# Altium PCB AVault.PcbDoc (part 1 of 2)
Units mm, origin at the board's own origin, x right, y up, seen from the top; angles counter-clockwise.
Board outline 85.78 x 73.28 mm, 2 copper layers (Top Layer, Bottom Layer); 122 components, 80 nets, 439 pads, 261 vias.
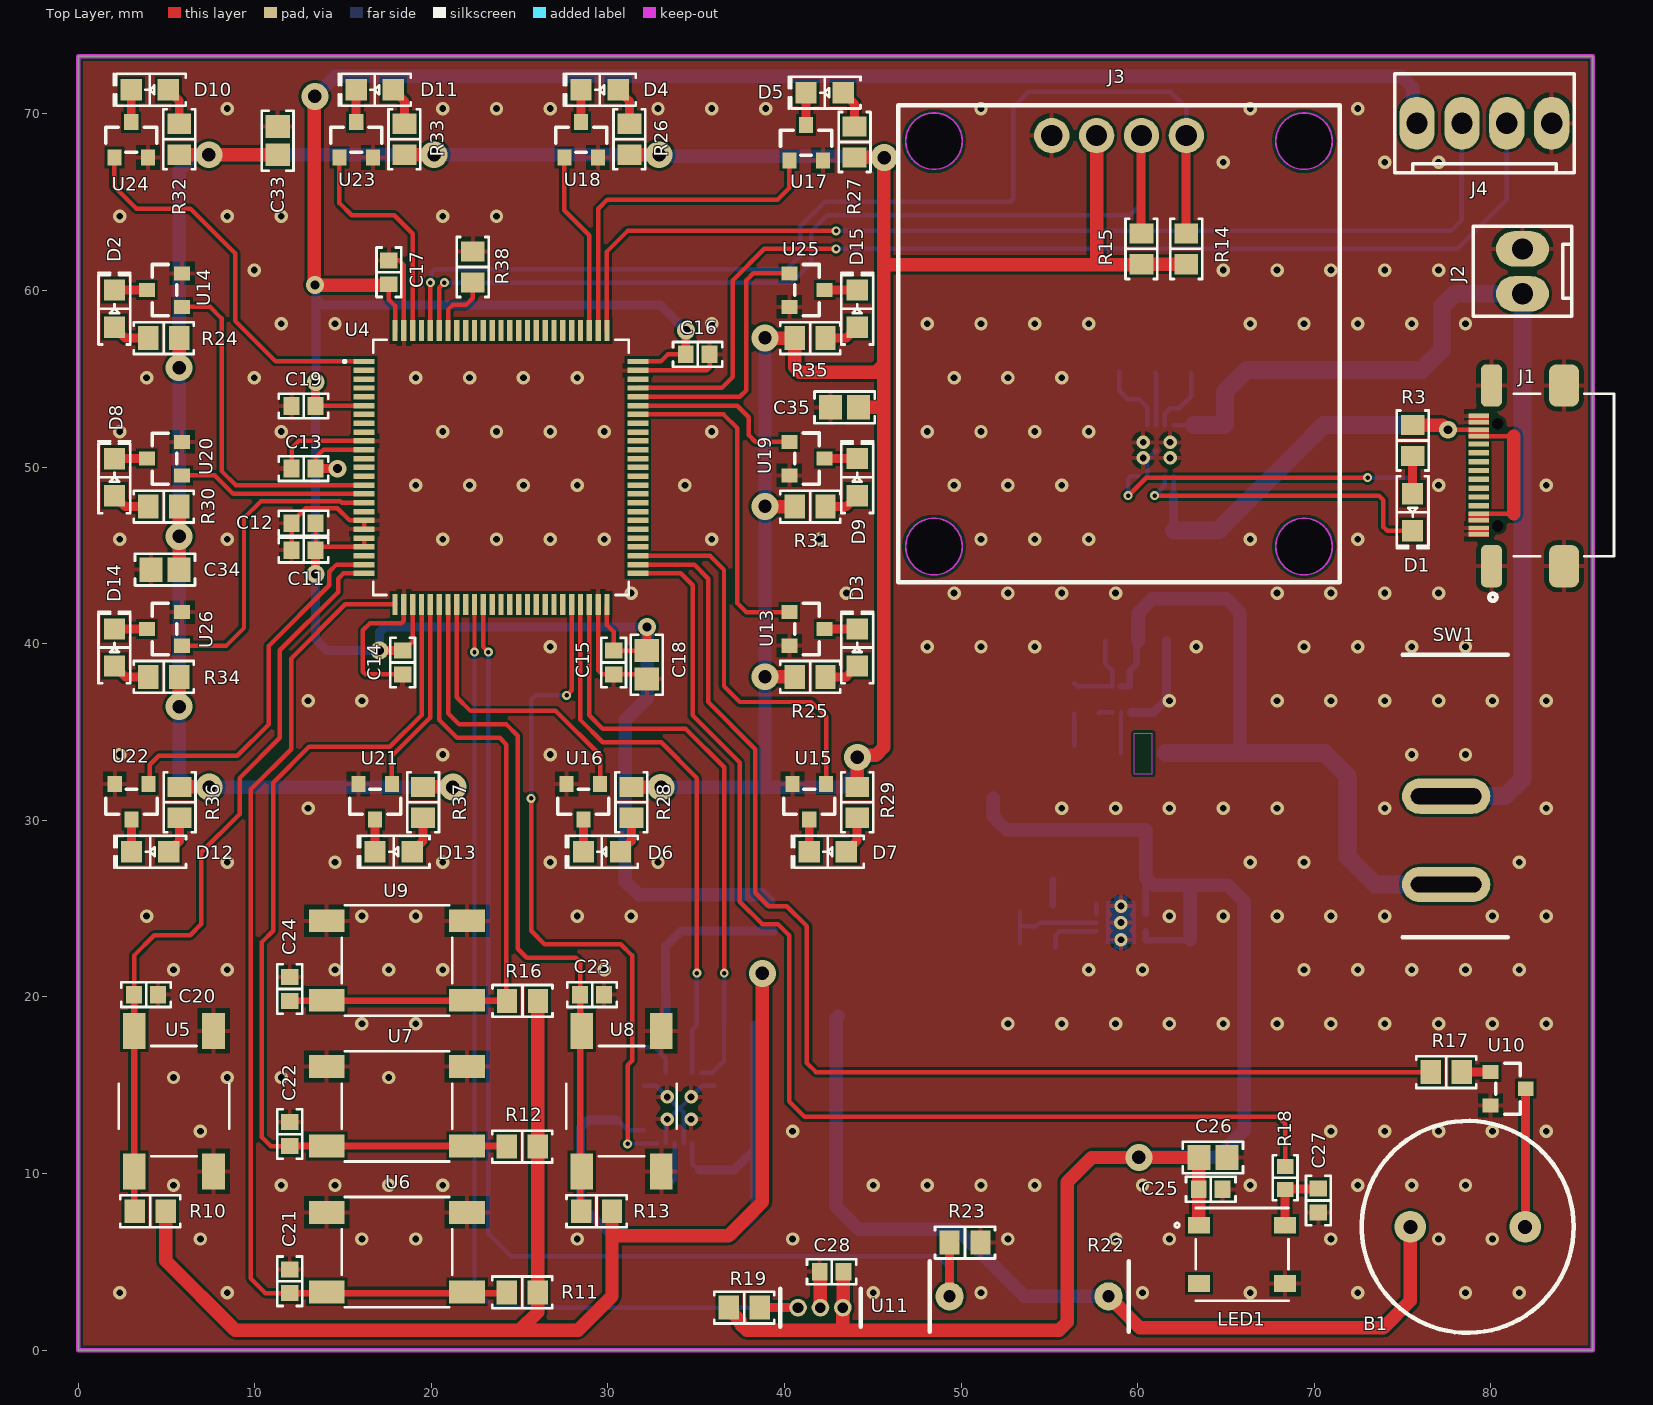
[diagram p0: Top Layer view]
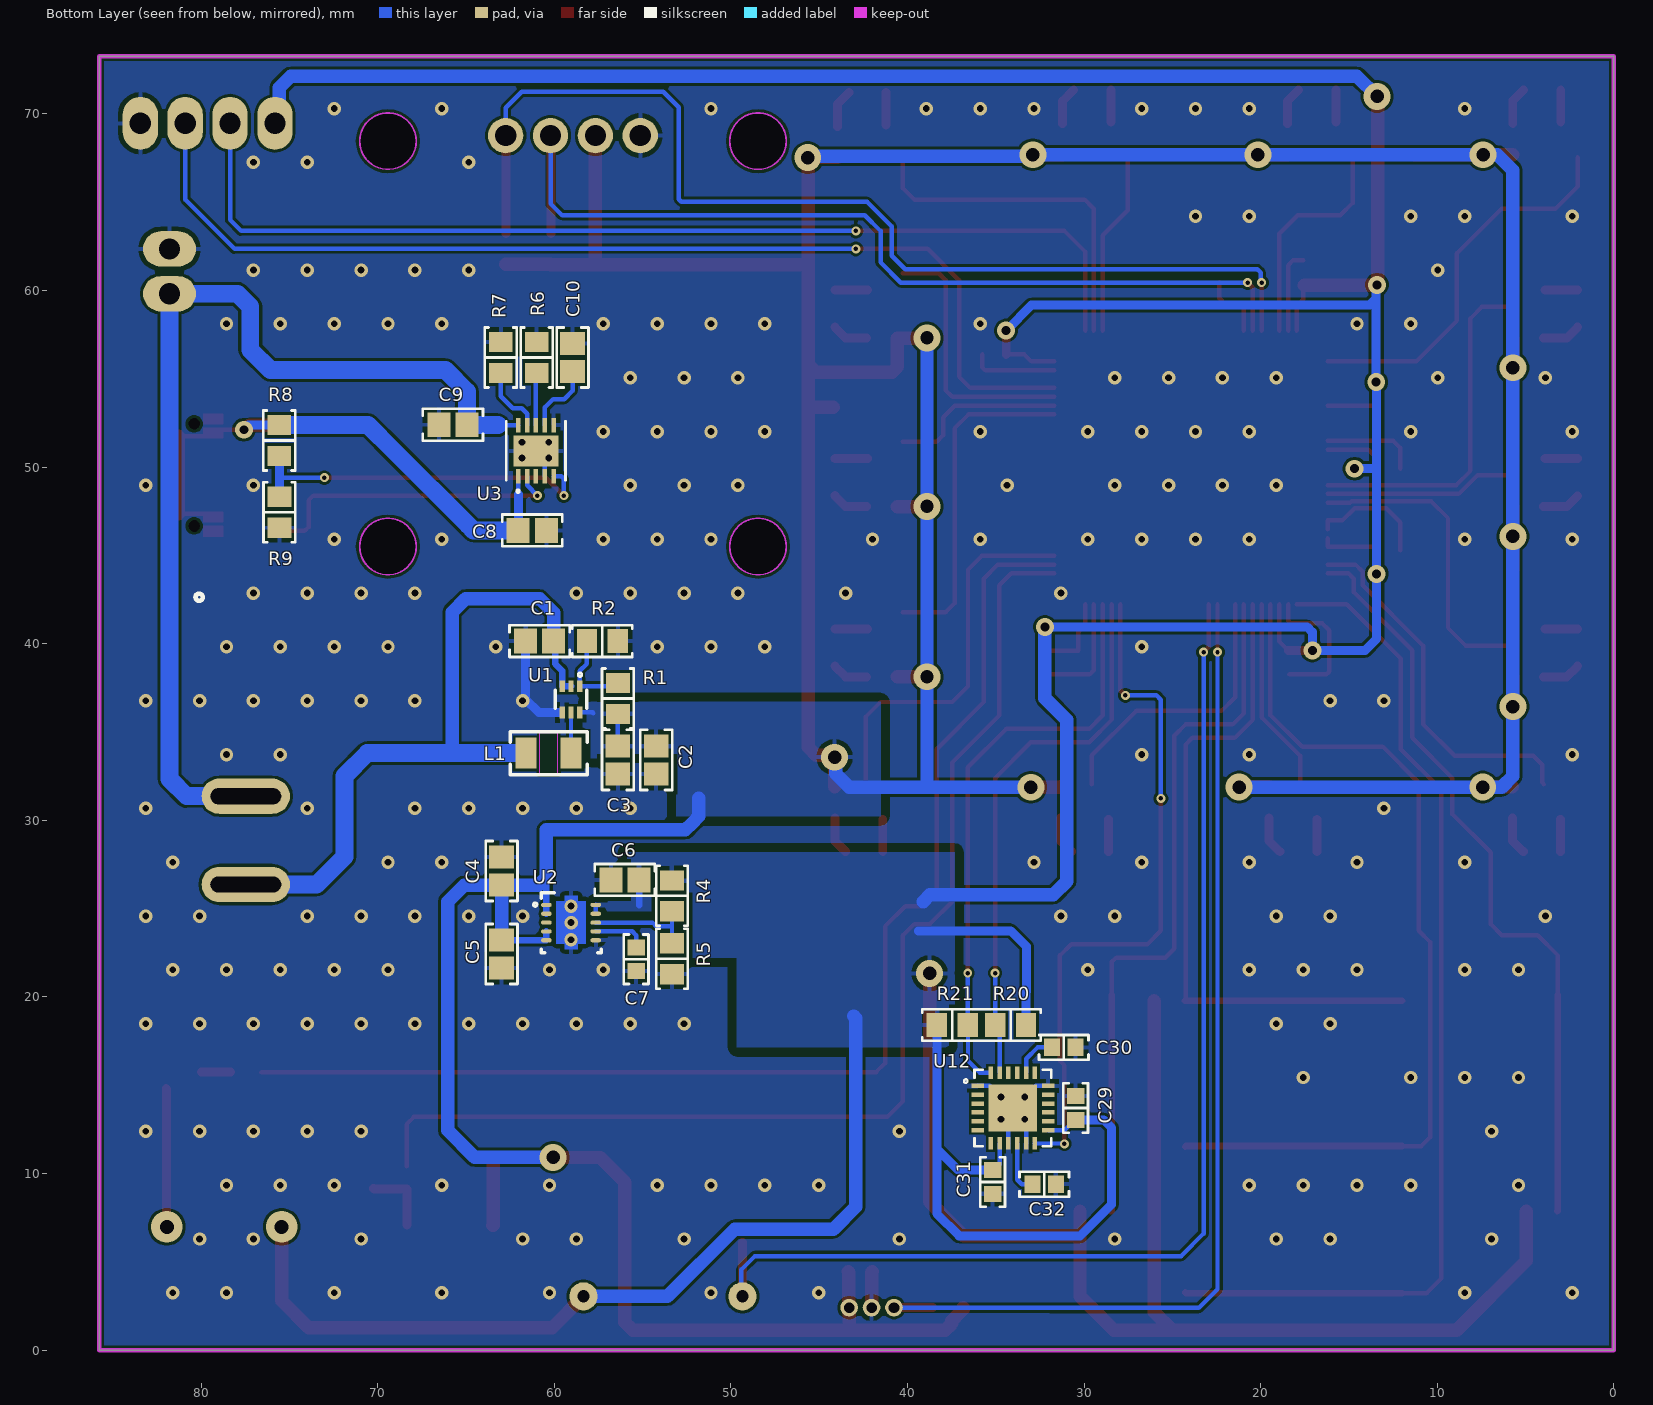
[diagram p1: Bottom Layer view, seen from below]
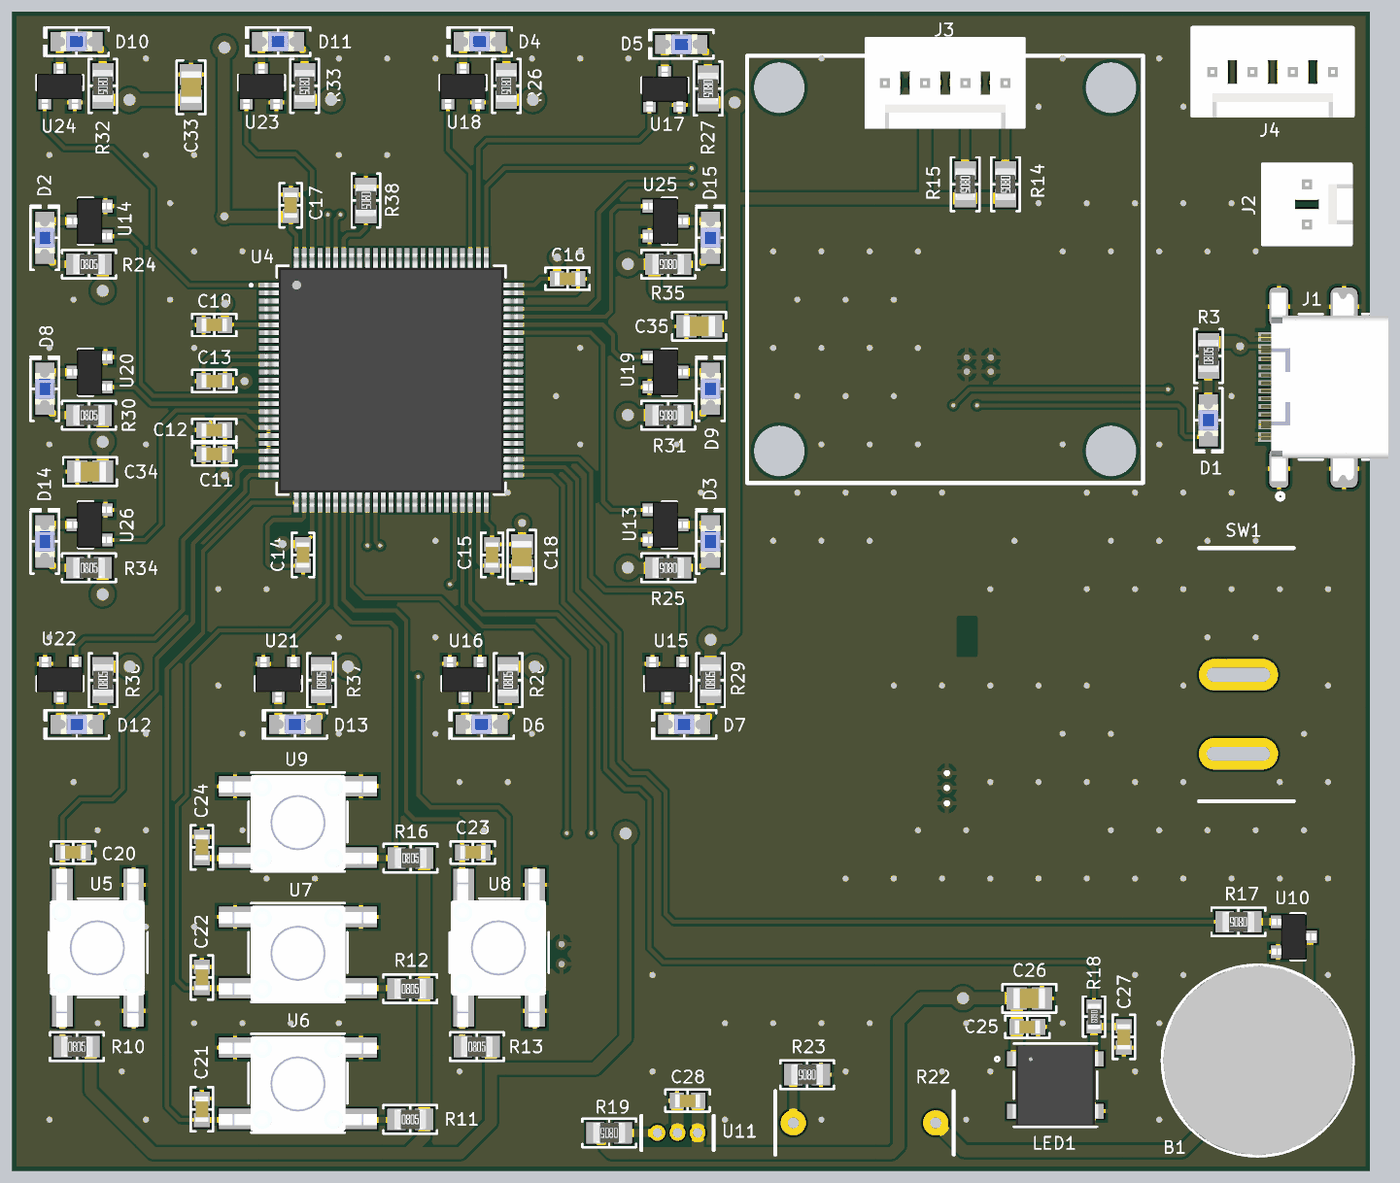
[diagram p3: 3D render of the assembled board from above, using the file's embedded part models]
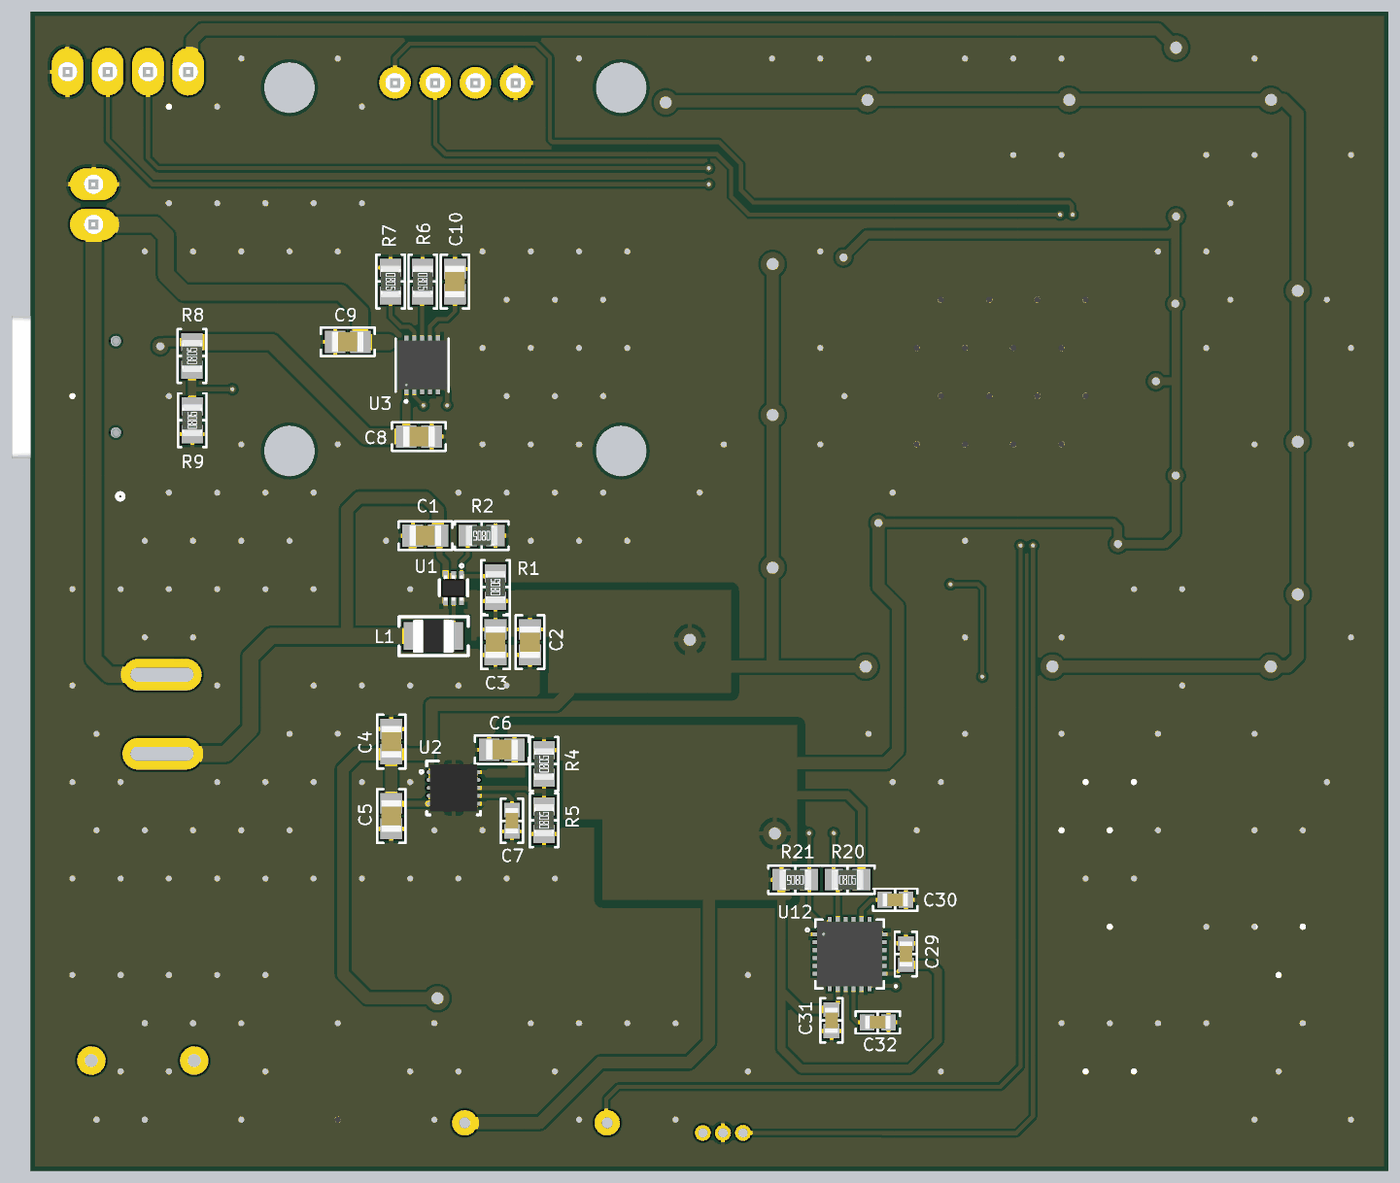
[diagram p4: 3D render of the assembled board from below, using the file's embedded part models]

## Layer stack, top to bottom
Top Solder: solder mask 0.0102, Solder Resist, Dk 3.5
Top Layer: signal copper 0.0356
Dielectric 1: dielectric 0.32, FR-4, Dk 4.8
Bottom Layer: signal copper 0.0356
Bottom Solder: solder mask 0.0102, Solder Resist, Dk 3.5

## Board outline
0,0 0,73.279 85.776,73.279 85.776,0
cut-out: 67.82,68.46 ccw(c69.42,68.46) 69.42,66.86 ccw(c69.42,68.46) 71.02,68.46 ccw(c69.42,68.46) 69.42,70.06 ccw(c69.42,68.46)
cut-out: 67.82,45.506 ccw(c69.42,45.506) 69.42,43.906 ccw(c69.42,45.506) 71.02,45.506 ccw(c69.42,45.506) 69.42,47.106 ccw(c69.42,45.506)
cut-out: 48.466,66.86 cw(c48.466,68.46) 46.866,68.46 cw(c48.466,68.46) 48.466,70.06 cw(c48.466,68.46) 50.066,68.46 cw(c48.466,68.46)
cut-out: 46.866,45.506 ccw(c48.466,45.506) 48.466,43.906 ccw(c48.466,45.506) 50.066,45.506 ccw(c48.466,45.506) 48.466,47.106 ccw(c48.466,45.506)

## Design rules (kind name [scope] priority, off if disabled: settings)
Clearance Clearance_1 [(InNet('+3V3') or InNet('+5V')) and InPolygon] p1: gap=0.508 ignorepadtopadclearanceinfootprint=FALSE
Clearance [All] p2: gap=0.152 ignorepadtopadclearanceinfootprint=FALSE
HoleSize [All] p1: absolutevalues=TRUE maxlimit=5 minlimit=0.025 maxpercent=80.000 minpercent=20.000
MinimumSolderMaskSliver [All] p1: minsoldermaskwidth=0.05
PasteMaskExpansion [All] p1: expansion=0 thpadusetoppaste=TRUE thpadusebottompaste=TRUE
PolygonConnect [All] p1: connectstyle=Relief reliefconductorwidth=0.254 reliefentries=4 polygonreliefangle="90 Angle" airgapwidth=0.254
RoutingVias [All] p1: holewidth=0.254 width=0.508 viastyle="Through Hole" minholewidth=0.203 minwidth=0.406 maxholewidth=0.762 maxwidth=1.524
SilkToSilkClearance [All] p1: silktosilkclearance=0.05
SilkToSolderMaskClearance [IsPad] p1: minsilkscreentomaskgap=0.05 clearancetoexposedcopper=TRUE
SolderMaskExpansion SolderMaskExpansion_Via [IsVia] p1: expansion=0 istentingtop=TRUE
SolderMaskExpansion [All] p2: expansion=0.1 istentingtop=FALSE
SupplyNets "Schematic Supply Nets_5" [InNet('VBUS')] p1: voltage=0.000
SupplyNets "Schematic Supply Nets_4" [InNet('+5V')] p2: voltage=0.000
SupplyNets "Schematic Supply Nets_3" [InNet('VBQ')] p3: voltage=0.000
SupplyNets "Schematic Supply Nets_2" [InNet('VBAT')] p4: voltage=0.000
SupplyNets "Schematic Supply Nets_1" [InNet('GND')] p5: voltage=0.000
SupplyNets "Schematic Supply Nets" [InNet('+3V3')] p6: voltage=0.000
Width [All] p1: maxlimit=1.016 minlimit=0.203 preferedwidth=0.203
25 further rules are at their usual default settings.

## Classes and differential pairs
component class U_Power: C1 C2 C3 C4 C5 C6 C7 C8 C9 C10 D1 J1 J2 L1 R1 R2 R3 R4 R5 R6 R7 R8 R9 SW1 U1 U2 U3
component class U_MCU: C11 C12 C13 C14 C15 C16 C17 C18 C19 J4 R38 U4
component class U_Lighting: C33 C34 C35 D2 D3 D4 D5 D6 D7 D8 D9 D10 D11 D12 D13 D14 D15 R24 R25 R26 R27 R28 R29 R30 R31 R32 R33 R34 R35 R36 R37 U13 U14 U15 U16 U17 U18 U19 U20 U21 U22 U23 U24 U25 U26
component class U_IO_Devices: B1 C20 C21 C22 C23 C24 C25 C26 C27 C28 C29 C30 C31 C32 J3 LED1 R10 R11 R12 R13 R14 R15 R16 R17 R18 R19 R20 R21 R22 R23 U5 U6 U7 U8 U9 U10 U11 U12

## Components (designator, comment, footprint, x,y, rotation, side; value= is the part's Value field where it differs from the comment)
B1 "HSD-1206W03" HSD-1206W03 78.688,6.985 r0 top
C1 "10 µF" "CAP 0805_2012" 60.833,40.154 r180 bottom
C2 "4.7 µF" "CAP 0805_2012" 54.229,33.423 r90 bottom
C3 "4.7 µF" "CAP 0805_2012" 56.402,33.423 r90 bottom
C4 "1 µF" "CAP 0805_2012" 62.988,27.135 r270 bottom
C5 "4.7 µF" "CAP 0805_2012" 62.988,22.436 r90 bottom
C6 "10 µF" "CAP 0805_2012" 56.003,26.627 r180 bottom
C7 "1000 pF" "CAP 0603_1608" 55.368,22.136 r90 bottom
C8 "1 µF" "CAP 0805_2012" 61.244,46.417 r0 bottom
C9 "4.7 µF" "CAP 0805_2012" 65.739,52.401 r0 bottom
C10 "1 µF" "CAP 0805_2012" 58.966,56.207 r270 bottom
C11 "0.1 µF" "CAP 0603_1608" 12.773,45.3 r0 top
C12 "1 µF" "CAP 0603_1608" 12.773,46.824 r0 top
C13 "0.1 µF" "CAP 0603_1608" 12.773,49.919 r0 top
C14 "0.1 µF" "CAP 0603_1608" 18.377,38.935 r90 top
C15 "0.1 µF" "CAP 0603_1608" 30.325,38.935 r90 top
C16 "0.1 µF" "CAP 0603_1608" 35.086,56.385 r180 top
C17 "0.1 µF" "CAP 0603_1608" 17.599,61.033 r270 top
C18 "10 µF" "CAP 0805_2012" 32.204,38.808 r90 top
C19 "1 µF" "CAP 0603_1608" 12.773,53.464 r0 top
C20 "0.1 µF" "CAP 0603_1608" 3.856,20.134 r180 top
C21 "0.1 µF" "CAP 0603_1608" 11.989,3.905 r270 top
C22 "0.1 µF" "CAP 0603_1608" 11.989,12.236 r270 top
C23 "0.1 µF" "CAP 0603_1608" 29.107,20.134 r180 top
C24 "0.1 µF" "CAP 0603_1608" 11.989,20.455 r270 top
C25 "0.1 µF" "CAP 0603_1608" 64.135,9.112 r180 top
C26 "10 µF" "CAP 0805_2012" 64.26,10.913 r180 top
C27 "0.1 µF" "CAP 0603_1608" 70.231,8.477 r90 top
C28 "0.1 µF" "CAP 0603_1608" 42.672,4.445 r0 top
C29 "0.1 µF" "CAP 0603_1608" 30.48,13.716 r270 bottom
C30 "2200 pF" "CAP 0603_1608" 31.155,17.145 r0 bottom
C31 "10000 pF" "CAP 0603_1608" 35.179,9.525 r90 bottom
C32 "0.1 µF" "CAP 0603_1608" 32.258,9.398 r0 bottom
C33 "10 µF" "CAP 0805_2012" 11.303,68.488 r270 top
C34 "10 µF" "CAP 0805_2012" 4.924,44.196 r0 top
C35 "10 µF" "CAP 0805_2012" 43.404,53.386 r0 top
D1 "Blue" "LED 0805_2012 BLUE" 75.565,47.444 r270 top
D2 "Blue" "LED 0805_2012 BLUE" 2.064,58.974 r90 top
D3 "Blue" "LED 0805_2012 BLUE" 44.12,39.789 r90 top
D4 "Blue" "LED 0805_2012 BLUE" 29.538,71.366 r180 top
D5 "Blue" "LED 0805_2012 BLUE" 42.275,71.203 r180 top
D6 "Blue" "LED 0805_2012 BLUE" 29.663,28.226 r180 top
D7 "Blue" "LED 0805_2012 BLUE" 42.453,28.226 r180 top
D8 "Blue" "LED 0805_2012 BLUE" 2.064,49.429 r90 top
D9 "Blue" "LED 0805_2012 BLUE" 44.12,49.435 r90 top
D10 "Blue" "LED 0805_2012 BLUE" 4.064,71.366 r180 top
D11 "Blue" "LED 0805_2012 BLUE" 16.801,71.366 r180 top
D12 "Blue" "LED 0805_2012 BLUE" 4.083,28.226 r180 top
D13 "Blue" "LED 0805_2012 BLUE" 17.873,28.226 r180 top
D14 "Blue" "LED 0805_2012 BLUE" 2.064,39.789 r90 top
D15 "Blue" "LED 0805_2012 BLUE" 44.12,58.974 r90 top
J1 "TYPE-C 16P QTWT" "TYPE-C 16P QTWT" 79.097,45.81 r90 top
J2 "0022272021" "MOLEX KK 0022272021" 81.788,61.087 r90 top
J3 "0022272041" "MOLEX KK 0022272041"#1 58.943,68.772 r0 top
J4 "0022272041" "MOLEX KK 0022272041"#2 79.629,69.469 r0 top
L1 "470nH" "IND 1008_2520" 60.325,33.804 r180 bottom
LED1 "WS2812B-V5" WS2812B-V5 65.913,5.429 r0 top
R1 "750 kOhms" "RES 0805_2012" 56.402,36.903 r90 bottom
R2 "100 kOhms" "RES 0805_2012" 57.277,40.154 r0 bottom
R3 "100 Ohms" "RES 0805_2012" 75.577,51.508 r90 top
R4 "3.6 kOhms" "RES 0805_2012" 53.336,25.724 r90 bottom
R5 "1.1 kOhms" "RES 0805_2012" 53.336,22.168 r90 bottom
R6 "22 kOhms" "RES 0805_2012" 60.998,56.207 r270 bottom
R7 "3.3 kOhms" "RES 0805_2012" 63.03,56.207 r270 bottom
R8 "510 kOhms" "RES 0805_2012" 75.577,51.508 r90 bottom
R9 "100 kOhms" "RES 0805_2012" 75.565,47.444 r90 bottom
R10 "10 kOhms" "RES 0805_2012" 4.088,7.865 r0 top
R11 "10 kOhms" "RES 0805_2012" 25.147,3.27 r0 top
R12 "10 kOhms" "RES 0805_2012" 25.147,11.525 r0 top
R13 "10 kOhms" "RES 0805_2012" 29.361,7.865 r0 top
R14 "4.7 kOhms" "RES 0805_2012" 62.753,62.357 r270 top
R15 "4.7 kOhms" "RES 0805_2012" 60.213,62.357 r270 top
R16 "10 kOhms" "RES 0805_2012" 25.17,19.78 r0 top
R17 "10 kOhms" "RES 0805_2012" 77.47,15.748 r180 top
R18 "220 Ohms" "RES 0603_1608" 68.349,9.762 r270 top
R19 "10 kOhms" "RES 0805_2012" 37.719,2.413 r180 top
R20 "4.7 kOhms" "RES 0805_2012" 34.163,18.415 r180 bottom
R21 "4.7 kOhms" "RES 0805_2012" 37.465,18.415 r0 bottom
R22 "MLG12516" MLG12516 53.848,3.048 r180 top
R23 "470 kOhms" "RES 0805_2012" 50.223,6.096 r180 top
R24 "100 Ohms" "RES 0805_2012" 4.858,57.307 r0 top
R25 "100 Ohms" "RES 0805_2012" 41.453,38.122 r180 top
R26 "100 Ohms" "RES 0805_2012" 31.222,68.572 r270 top
R27 "100 Ohms" "RES 0805_2012" 43.967,68.409 r270 top
R28 "100 Ohms" "RES 0805_2012" 31.33,31.02 r90 top
R29 "100 Ohms" "RES 0805_2012" 44.12,31.02 r90 top
R30 "100 Ohms" "RES 0805_2012" 4.858,47.762 r0 top
R31 "100 Ohms" "RES 0805_2012" 41.453,47.768 r180 top
R32 "100 Ohms" "RES 0805_2012" 5.733,68.572 r270 top
R33 "100 Ohms" "RES 0805_2012" 18.478,68.572 r270 top
R34 "100 Ohms" "RES 0805_2012" 4.858,38.122 r0 top
R35 "100 Ohms" "RES 0805_2012" 41.453,57.307 r180 top
R36 "100 Ohms" "RES 0805_2012" 5.75,31.02 r90 top
R37 "100 Ohms" "RES 0805_2012" 19.54,31.02 r90 top
R38 "10 kOhms" "RES 0805_2012" 22.352,61.333 r270 top
SW1 "KCD11-101N" KCD11-101N 77.47,31.369 r90 top
U1 "TPS61023DRLR" DRL0006A 59.055,36.852 r270 bottom
U2 "TPS74801DRCR" DRC0010A 59.051,24.214 r180 bottom
U3 "MP26028EQ-LF-Z" IC10_MP26028_MNP 61.04,50.927 r90 bottom
U4 "STM32F103VET6" LQFP100-14x14mm 23.949,49.984 r0 top
U5 "PTS645SM43SMTR92LFS" SWITCH_43SMTR92LFS 5.431,14.105 r90 top
U6 "PTS645SM43SMTR92LFS" SWITCH_43SMTR92LFS 18.058,5.556 r180 top
U7 "PTS645SM43SMTR92LFS" SWITCH_43SMTR92LFS 18.058,13.811 r180 top
U8 "PTS645SM43SMTR92LFS" SWITCH_43SMTR92LFS 30.774,14.105 r90 top
U9 "PTS645SM43SMTR92LFS" SWITCH_43SMTR92LFS 18.058,22.066 r180 top
U10 "2N7002A-7" "DIODES SOT-23-3" 80.972,14.805 r0 top
U11 "A3144EUA" A3144EUA 42.926,2.413 r180 top
U12 "MPU-6050" QFN24_4X4X0P9-0P5_TDK 34.036,13.716 r180 bottom
U13 "2N7002A-7" "DIODES SOT-23-3" 41.275,40.839 r0 top
U14 "2N7002A-7" "DIODES SOT-23-3" 4.896,60.024 r180 top
U15 "2N7002A-7" "DIODES SOT-23-3" 41.403,31.058 r270 top
U16 "2N7002A-7" "DIODES SOT-23-3" 28.613,31.058 r270 top
U17 "2N7002A-7" "DIODES SOT-23-3" 41.225,68.372 r90 top
U18 "2N7002A-7" "DIODES SOT-23-3" 28.488,68.534 r90 top
U19 "2N7002A-7" "DIODES SOT-23-3" 41.275,50.485 r0 top
U20 "2N7002A-7" "DIODES SOT-23-3" 4.896,50.479 r180 top
U21 "2N7002A-7" "DIODES SOT-23-3" 16.823,31.058 r270 top
U22 "2N7002A-7" "DIODES SOT-23-3" 3.033,31.058 r270 top
U23 "2N7002A-7" "DIODES SOT-23-3" 15.751,68.534 r90 top
U24 "2N7002A-7" "DIODES SOT-23-3" 3.014,68.534 r90 top
U25 "2N7002A-7" "DIODES SOT-23-3" 41.275,60.024 r0 top
U26 "2N7002A-7" "DIODES SOT-23-3" 4.896,40.839 r180 top

## Footprints (in the part's own frame and the unit in brackets; to place one, negate y for a bottom-side part, rotate by r counter-clockwise, add the part's x,y. Pads: shape width x height; smd on the part's side, far side on the other; paste and mask are expansions set on the pad)
A3144EUA [mm] "Digital Switch Unipolar Switch Current Source Hall Effect 3-SIP"
  round 1 hole 0.6: 1(-0.381,0) 2(0.889,0) 3(2.159,0)
  silkscreen extent -1.4,-1.08 3.17,1.08
"CAP 0603_1608" [mm] "Chip Capacitor, 2-Leads, Body 1.60x0.80mm, IPC Medium Density"
  rect 0.9x1 smd: 1(-0.675,0) 2(0.675,0)
  silkscreen extent -1.4,-0.7 1.4,0.7, body extent -0.8,-0.41 0.8,0.41, height 0.82
"CAP 0805_2012" [mm] "Chip Capacitor, 2-Leads, Body 2.00x1.20mm, IPC Medium Density"
  rect 1.3x1.4 smd: 1(-0.8,0) 2(0.8,0)
  silkscreen extent -1.7,-0.9 1.7,0.9, body extent -1,-0.64 1,0.64, height 1.26
"DIODES SOT-23-3" [mm] "SOT23, 3-Leads, Body 2.90x2.40mm, Pitch 0.95mm, IPC Medium Density"
  rect 0.9x0.8 smd: 1(-1,0.95) 2(-1,-0.95) 3(1,0)
  silkscreen extent -0.7,-1.45 0.7,1.45, body extent -1.41,-1.45 1.41,1.45, height 1.5
DRC0010A [mm] "Linear Voltage Regulator IC Positive Adjustable 1 Output 1.5A 10-VSON (3x3)"
  oval 0.6x0.24 smd: 1(-1.4,1) 2(-1.4,0.5) 3(-1.4,0) 4(-1.4,-0.5) 5(-1.4,-1) 6(1.4,-1) 7(1.4,-0.5) 8(1.4,0) 9(1.4,0.5) 10(1.4,1)
  round 0.025 smd: 11(0,0.002)
  Top Layer region: -0.367,-1.5 0.367,-1.5 0.367,-1.2 0.825,-1.2 0.825,1.2 0.366,1.2 0.366,1.504 -0.364,1.504 -0.364,1.2 -0.825,1.2 -0.825,-1.2 -0.367,-1.2
  silkscreen extent -2.13,-1.7 1.7,1.7, body extent -1.5,-1.5 1.5,1.5, height 1
DRL0006A [mm]
  rect 0.67x0.3 smd mask+0.05: 1(-0.74,0.5) 2(-0.74,0) 3(-0.74,-0.5) 4(0.74,-0.5) 5(0.74,0) 6(0.74,0.5)
  silkscreen extent -1.5,-0.89 0.51,0.89, body extent -0.8,-0.78 0.8,0.78, height 0.6
HSD-1206W03 [mm]
  round 1.8 hole 0.8: 1(-3.25,0) 2(3.25,0)
  silkscreen extent -6,-6 6,6, body extent -6,-6 6.01,6, height 9.5
IC10_MP26028_MNP [mil]
  rect 32x10 smd mask+1.97: 1(-57,39.37) 2(-57,19.68) 3(-57,0) 4(-57,-19.68) 5(-57,-39.37) 6(57,-39.37) 7(57,-19.68) 8(57,0) 9(57,19.68) 10(57,39.37)
  rect 69x100 smd mask+1.97: 11(0,0)
  silkscreen extent -93,-66 66,66, body extent -61,-61 61,61, height 39
"IND 1008_2520" [mm] "Chip Inductance, 2-leads, Body 2.5x2.1mm, IPC Medium Density"
  rect 1.2x1.75 smd: 1(-1.275,0) 2(1.275,0)
  silkscreen extent -2.18,-1.22 2.2,1.22, body extent -1.3,-1.05 1.3,1.05, height 1
KCD11-101N [mm] "Rocket Switch SPST"
  oval 2x5 hole 0.9 slot 4 at 90 deg: 1(0,0) 2(-5,0)
  silkscreen extent -8,-3.49 8,2.48
"LED 0805_2012 BLUE" [mm] "Chip Diode, 2-Leads, Body 2.00x1.25mm, IPC Medium Density"
  rect 1.2x1.2 smd: 1(-1.05,0) 2(1.05,0)
  silkscreen extent -2.03,-0.9 2.03,0.9, body extent -1,-0.63 1,0.63, height 0.9
LQFP100-14x14mm [mil] "Mainstream Performance line, Arm Cortex-M3 MCU with 512 Kbytes of Flash memory, 72 MHz CPU, motor control, USB and CAN"
  rect 47x12 smd mask+1.97: 1(-305.12,236.22) 2(-305.12,216.54) 3(-305.12,196.85) 4(-305.12,177.17) 5(-305.12,157.48) 6(-305.12,137.8) 7(-305.12,118.11) 8(-305.12,98.43) 9(-305.12,78.74) 10(-305.12,59.06) 11(-305.12,39.37) 12(-305.12,19.69) 13(-305.12,0) 14(-305.12,-19.68) 15(-305.12,-39.37) 16(-305.12,-59.06) 17(-305.12,-78.74) 18(-305.12,-98.43) 19(-305.12,-118.11) 20(-305.12,-137.8) 21(-305.12,-157.48) 22(-305.12,-177.17) 23(-305.12,-196.85) 24(-305.12,-216.54) 25(-305.12,-236.22) 51(305.12,-236.22) 52(305.12,-216.54) 53(305.12,-196.85) 54(305.12,-177.17) 55(305.12,-157.48) 56(305.12,-137.8) 57(305.12,-118.11) 58(305.12,-98.43) 59(305.12,-78.74) 60(305.12,-59.06) 61(305.12,-39.37) 62(305.12,-19.68) 63(305.12,0) 64(305.12,19.68) 65(305.12,39.37) 66(305.12,59.06) 67(305.12,78.74) 68(305.12,98.43) 69(305.12,118.11) 70(305.12,137.8) 71(305.12,157.48) 72(305.12,177.17) 73(305.12,196.85) 74(305.12,216.54) 75(305.12,236.22)
  rect 12x47 smd mask+1.97: 26(-236.22,-305.12) 27(-216.54,-305.12) 28(-196.85,-305.12) 29(-177.17,-305.12) 30(-157.48,-305.12) 31(-137.8,-305.12) 32(-118.11,-305.12) 33(-98.43,-305.12) 34(-78.74,-305.12) 35(-59.06,-305.12) 36(-39.37,-305.12) 37(-19.68,-305.12) 38(0,-305.12) 39(19.68,-305.12) 40(39.37,-305.12) 41(59.06,-305.12) 42(78.74,-305.12) 43(98.43,-305.12) 44(118.11,-305.12) 45(137.8,-305.12) 46(157.48,-305.12) 47(177.17,-305.12) 48(196.85,-305.12) 49(216.54,-305.12) 50(236.22,-305.12) 76(236.22,305.12) 77(216.54,305.12) 78(196.85,305.12) 79(177.17,305.12) 80(157.48,305.12) 81(137.8,305.12) 82(118.11,305.12) 83(98.43,305.12) 84(78.74,305.12) 85(59.06,305.12) 86(39.37,305.12) 87(19.68,305.12) 88(0,305.12) 89(-19.68,305.12) 90(-39.37,305.12) 91(-59.06,305.12) 92(-78.74,305.12) 93(-98.43,305.12) 94(-118.11,305.12) 95(-137.8,305.12) 96(-157.48,305.12) 97(-177.17,305.12) 98(-196.85,305.12) 99(-216.54,305.12) 100(-236.22,305.12)
  silkscreen extent -351,-284 284,284, body extent -315,-315 315,315, height 63
MLG12516 [mm] "CDS PHOTORESISTOR"
  round 1.6 hole 0.7: 1(-4.5,0) 2(4.5,0)
  silkscreen extent -5.64,-2 5.64,2
"MOLEX KK 0022272021" [mm]
  oval 2x3 hole 1.2: 1(-1.27,0) 2(1.27,0)
  silkscreen extent -2.54,-2.79 2.54,2.79, body extent -2.54,-2.9 2.54,2.9, height 11.7
"MOLEX KK 0022272041"#1 [mm]
  round 2 hole 1.2: 1(-3.81,0) 2(-1.27,0) 3(1.27,0) 4(3.81,0)
  body extent -5.08,-2.9 5.08,2.9, height 11.7
"MOLEX KK 0022272041"#2 [mm]
  oval 2x3 hole 1.2: 1(-3.81,0) 2(-1.27,0) 3(1.27,0) 4(3.81,0)
  silkscreen extent -5.08,-2.79 5.08,2.79, body extent -5.08,-2.9 5.08,2.9, height 11.7
QFN24_4X4X0P9-0P5_TDK [mil]
  rect 27.81x10.03 smd: 1(-78.41,49.23)
  rect 27.81x10.03 smd mask+1.97: 2(-78.41,29.54) 3(-78.41,9.85) 4(-78.41,-9.85) 5(-78.41,-29.53) 6(-78.41,-49.22) 13(78.41,-49.22) 14(78.41,-29.53) 15(78.41,-9.85) 16(78.41,9.85) 17(78.41,29.54) 18(78.41,49.23)
  rect 10.03x27.81 smd mask+1.97: 7(-49.22,-78.41) 8(-29.53,-78.41) 9(-9.85,-78.41) 10(9.84,-78.41) 11(29.53,-78.41) 12(49.22,-78.41) 19(49.22,78.41) 20(29.53,78.41) 21(9.84,78.41) 22(-9.85,78.41) 23(-29.53,78.41) 24(-49.22,78.41)
  rect 108x104 smd mask+1.97: 25(0,0)
  silkscreen extent -109,-86 86,86, body extent -81,-81 81,81, height 37
"RES 0603_1608" [mm] "Chip Resistor, 2-Leads, Body 1.60x0.80mm, IPC Medium Density"
  rect 0.85x0.95 smd: 1(-0.65,0) 2(0.65,0)
  silkscreen extent -1.27,-0.7 1.27,0.7, body extent -0.8,-0.4 0.8,0.4, height 0.45
"RES 0805_2012" [mm] "Chip Resistor, 2-Leads, Body 2.00x1.25mm, IPC Medium Density"
  rect 1.15x1.35 smd: 1(-0.875,0) 2(0.875,0)
  silkscreen extent -1.7,-0.9 1.7,0.9, body extent -1,-0.62 1,0.63, height 0.6
SWITCH_43SMTR92LFS [mm]
  rect 2.032x1.295 smd: 1(-3.975,2.25) 2(3.975,2.25) 3(-3.975,-2.25) 4(3.975,-2.25)
  silkscreen extent -3.12,-3.12 3.12,3.12, body extent -5,-2.95 5,3.05, height 4.3
"TYPE-C 16P QTWT" [mil] "USB Type-C Female Connector USB 3, Right Angle, 16P 3A 1 Ports"
  oval 0x26 hole 26 unplated: 21(33.9,-50.94) 22(261.45,-50.94)
  rect 10x45 smd mask+1: A1(15.32,-8.5) A4(47.04,-8.5) B9(61.04,-8.5) B12(29.32,-8.5)
  rect 12x45 smd mask+2: A5(98.45,-8.5) A6(137.83,-8.5) A7(157.52,-8.5) A8(196.9,-8.5) B5(216.59,-8.5) B6(177.21,-8.5) B7(118.14,-8.5) B8(78.76,-8.5)
  rect 10x45 smd mask+0.98: A9(248.31,-8.5) A12(279.06,-8.5) B1(265.06,-8.5) B4(234.31,-8.5)
  rrect50% 94.49x47.24 smd: S_1(-55.87,-36.81) S_2(346.97,-36.81)
  rrect50% 94.49x66.93 smd: S_3(-55.87,-198.57) S_4(346.97,-198.57)
  Top Layer region: 66.04,14 42.04,14 42.04,-31 66.04,-31
  Top Layer region: 253.31,14 229.31,14 229.31,-31 253.31,-31
  Top Layer region: 34.32,14 10.32,14 10.32,-31 34.32,-31
  Top Layer region: 284.06,14 260.06,14 260.06,-31 284.06,-31
  silkscreen extent -133,-310 329,-32, body extent -87,-309 381,8, height 126
WS2812B-V5 [mm] "ADDRESS LED RED/GRN/BLUE"
  rect 1.239x0.939 smd: 1(-2.436,1.65) 2(-2.436,-1.65) 3(2.436,-1.65) 4(2.436,1.65)
  silkscreen extent -3.81,-2.63 2.63,2.63, body extent -2.71,-2.5 2.71,2.5, height 1.6

## Part data
B1: "BUZZER MAGNETIC 3V 12MM TH"
C1 C6 C18 C26 C33 C34 C35: library part C2012X5R1V106K125AC, "CAP CER 10UF 35V X5R 0805", Device Package="0805 (2012 Metric)", Manufacturer="TDK Corporation", Operating Temperature="-55°C ~ 85°C", Supplier Part Number 1=445-14418-1-ND, Temperature Coefficient=X5R, Tolerance=±10%, Voltage - Rated=35V, Applications="General Purpose", Capacitance="10 µF", ComponentLink1Description=Datasheet, ComponentLink1URL=https:\\product.tdk.com\info\en\catalog\datasheets\mlcc_commercial_general_en.pdf?ref_disty=digikey, ComponentLink2Description="DigiKey Link", ComponentLink2URL=https:\\www.digikey.com\en\products\detail\tdk-corporation\C2012X5R1V106K125AC\3951654, Features="Low ESL", id=6404, LastUpdated=2023-01-03T20:10:34.680, Lifecycle Status=Active, Minimum Order=1, Mounting Type="Surface Mount, MLCC", Package / Case="0805 (2012 Metric)", Packaging=TapeAndReel, Part Number=C2012X5R1V106K125AC, Part Status=Active, PartId=40531, Price=0.14, Series=C, Size / Dimension="0.079\" L x 0.049\" W (2.00mm x 1.25mm)", Supplier 1=DigiKey, Thickness (Max)="0.057\" (1.45mm)"
C2 C3 C5 C9: library part C2012X5R1H475K125AB, "CAP CER 4.7UF 50V X5R 0805", Device Package="0805 (2012 Metric)", Manufacturer="TDK Corporation", Operating Temperature="-55°C ~ 85°C", Supplier Part Number 1=445-5980-1-ND, Temperature Coefficient=X5R, Tolerance=±10%, Voltage - Rated=50V, Applications="General Purpose", Capacitance="4.7 µF", ComponentLink1Description=Datasheet, ComponentLink1URL=https:\\product.tdk.com\info\en\catalog\datasheets\mlcc_commercial_general_en.pdf?ref_disty=digikey, ComponentLink2Description="DigiKey Link", ComponentLink2URL=https:\\www.digikey.com\en\products\detail\tdk-corporation\C2012X5R1H475K125AB\2443458, Features="Low ESL", id=2789, LastUpdated=2023-01-03T20:10:23.257, Lifecycle Status=Active, Minimum Order=1, Mounting Type="Surface Mount, MLCC", Package / Case="0805 (2012 Metric)", Packaging=TapeAndReel, Part Number=C2012X5R1H475K125AB, Part Status=Active, PartId=15315, Price=0.09, Series=C, Size / Dimension="0.079\" L x 0.049\" W (2.00mm x 1.25mm)", Supplier 1=DigiKey, Thickness (Max)="0.057\" (1.45mm)"
C4 C8 C10: library part C2012X7R1H105K125AB, "CAP CER 1UF 50V X7R 0805", Device Package="0805 (2012 Metric)", Manufacturer="TDK Corporation", Operating Temperature="-55°C ~ 125°C", Supplier Part Number 1=445-7547-1-ND, Temperature Coefficient=X7R, Tolerance=±10%, Voltage - Rated=50V, Applications="General Purpose", Capacitance="1 µF", ComponentLink1Description=Datasheet, ComponentLink1URL=https:\\product.tdk.com\info\en\catalog\datasheets\mlcc_commercial_general_en.pdf?ref_disty=digikey, ComponentLink2Description="DigiKey Link", ComponentLink2URL=https:\\www.digikey.com\en\products\detail\tdk-corporation\C2012X7R1H105K125AB\2732982, Features="Low ESL", id=6079, LastUpdated=2023-01-03T20:10:09.350, Lifecycle Status=Active, Minimum Order=1, Mounting Type="Surface Mount, MLCC", Package / Case="0805 (2012 Metric)", Packaging=TapeAndReel, Part Number=C2012X7R1H105K125AB, Part Status=Active, PartId=39229, Price=0.05, Series=C, Size / Dimension="0.079\" L x 0.049\" W (2.00mm x 1.25mm)", Supplier 1=DigiKey, Thickness (Max)="0.057\" (1.45mm)"
C7: library part C1608NP02A102J080AA, "CAP CER 1000PF 100V NP0 0603", Device Package="0603 (1608 Metric)", Manufacturer="TDK Corporation", Operating Temperature="-55°C ~ 150°C", Supplier Part Number 1=445-14106-1-ND, Temperature Coefficient="C0G, NP0", Tolerance=±5%, Voltage - Rated=100V, Applications="General Purpose", Capacitance="1000 pF", ComponentLink1Description=Datasheet, ComponentLink1URL=https:\\product.tdk.com\info\en\catalog\datasheets\mlcc_commercial_hightemp_en.pdf?ref_disty=digikey, ComponentLink2Description="DigiKey Link", ComponentLink2URL=https:\\www.digikey.com\en\products\detail\tdk-corporation\C1608NP02A102J080AA\3951342, Features="High Temperature", id=4166, LastUpdated=2023-01-03T20:07:00.130, Lifecycle Status=Active, Minimum Order=1, Mounting Type="Surface Mount, MLCC", Package / Case="0603 (1608 Metric)", Packaging=TapeAndReel, Part Number=C1608NP02A102J080AA, Part Status=Active, PartId=17647, Price=0.03, Series=C, Size / Dimension="0.063\" L x 0.031\" W (1.60mm x 0.80mm)", Supplier 1=DigiKey, Thickness (Max)="0.035\" (0.90mm)"
C11 C13 C14 C15 C16 C17 C20 C21 C22 C23 C24 C25 C27 C28 C29 C32: library part GRM188R72A104KA35D, "CAP CER 0.1UF 100V X7R 0603", Device Package="0603 (1608 Metric)", Manufacturer="Murata Electronics", Operating Temperature="-55°C ~ 125°C", Supplier Part Number 1=490-3285-1-ND, Temperature Coefficient=X7R, Tolerance=±10%, Voltage - Rated=100V, Applications="General Purpose", Capacitance="0.1 µF", ComponentLink1Description=Datasheet, ComponentLink1URL=https:\\www.murata.com\~\media\webrenewal\support\library\catalog\products\capacitor\mlcc\c02e.ashx?la=en-us, ComponentLink2Description="DigiKey Link", ComponentLink2URL=https:\\www.digikey.com\en\products\detail\murata-electronics\GRM188R72A104KA35D\702549, id=1738, LastUpdated=2023-01-03T20:07:27.117, Lifecycle Status=Active, Minimum Order=1, Mounting Type="Surface Mount, MLCC", Package / Case="0603 (1608 Metric)", Packaging=TapeAndReel, Part Number=GRM188R72A104KA35D, Part Status=Active, PartId=9563, Price=0.02, Series=GRM, Size / Dimension="0.063\" L x 0.031\" W (1.60mm x 0.80mm)", Supplier 1=DigiKey, Thickness (Max)="0.035\" (0.90mm)"
C12 C19: library part C1608X5R1E105K080AC, "CAP CER 1UF 25V X5R 0603", Device Package="0603 (1608 Metric)", Manufacturer="TDK Corporation", Operating Temperature="-55°C ~ 85°C", Supplier Part Number 1=445-5146-1-ND, Temperature Coefficient=X5R, Tolerance=±10%, Voltage - Rated=25V, Applications="General Purpose", Capacitance="1 µF", ComponentLink1Description=Datasheet, ComponentLink1URL=https:\\product.tdk.com\info\en\catalog\datasheets\mlcc_commercial_general_en.pdf?ref_disty=digikey, ComponentLink2Description="DigiKey Link", ComponentLink2URL=https:\\www.digikey.com\en\products\detail\tdk-corporation\C1608X5R1E105K080AC\2093414, Features="Low ESL", id=6225, LastUpdated=2023-01-03T20:06:52.917, Lifecycle Status=Active, Minimum Order=1, Mounting Type="Surface Mount, MLCC", Package / Case="0603 (1608 Metric)", Packaging=TapeAndReel, Part Number=C1608X5R1E105K080AC, Part Status=Active, PartId=36204, Price=0.01, Series=C, Size / Dimension="0.063\" L x 0.031\" W (1.60mm x 0.80mm)", Supplier 1=DigiKey, Thickness (Max)="0.035\" (0.90mm)"
C30: library part C1608NP02A222J080AA, "CAP CER 2200PF 100V NP0 0603", Device Package="0603 (1608 Metric)", Manufacturer="TDK Corporation", Operating Temperature="-55°C ~ 150°C", Supplier Part Number 1=445-15272-1-ND, Temperature Coefficient="C0G, NP0", Tolerance=±5%, Voltage - Rated=100V, Applications="General Purpose", Capacitance="2200 pF", ComponentLink1Description=Datasheet, ComponentLink1URL=https:\\product.tdk.com\info\en\catalog\datasheets\mlcc_commercial_hightemp_en.pdf?ref_disty=digikey, ComponentLink2Description="DigiKey Link", ComponentLink2URL=https:\\www.digikey.com\en\products\detail\tdk-corporation\C1608NP02A222J080AA\4278005, Features="High Temperature", id=7609, LastUpdated=2023-01-03T20:07:16.653, Lifecycle Status=Active, Minimum Order=1, Mounting Type="Surface Mount, MLCC", Package / Case="0603 (1608 Metric)", Packaging=TapeAndReel, Part Number=C1608NP02A222J080AA, Part Status=Active, PartId=40621, Price=0.04, Series=C, Size / Dimension="0.063\" L x 0.031\" W (1.60mm x 0.80mm)", Supplier 1=DigiKey, Thickness (Max)="0.035\" (0.90mm)"
C31: library part C1608NP01H103J080AA, "CAP CER 10000PF 50V NP0 0603", Device Package="0603 (1608 Metric)", Manufacturer="TDK Corporation", Operating Temperature="-55°C ~ 150°C", Supplier Part Number 1=445-14056-1-ND, Temperature Coefficient="C0G, NP0", Tolerance=±5%, Voltage - Rated=50V, Applications="General Purpose", Capacitance="10000 pF", ComponentLink1Description=Datasheet, ComponentLink1URL=https:\\product.tdk.com\info\en\catalog\datasheets\mlcc_commercial_hightemp_en.pdf?ref_disty=digikey, ComponentLink2Description="DigiKey Link", ComponentLink2URL=https:\\www.digikey.com\en\products\detail\tdk-corporation\C1608NP01H103J080AA\3951292, Features="High Temperature", id=2977, LastUpdated=2023-01-03T20:07:13.587, Lifecycle Status=Active, Minimum Order=1, Mounting Type="Surface Mount, MLCC", Package / Case="0603 (1608 Metric)", Packaging=TapeAndReel, Part Number=C1608NP01H103J080AA, Part Status=Active, PartId=14361, Price=0.07, Series=C, Size / Dimension="0.063\" L x 0.031\" W (1.60mm x 0.80mm)", Supplier 1=DigiKey, Thickness (Max)="0.035\" (0.90mm)"
D1 D2 D3 D4 D5 D6 D7 D8 D9 D10 D11 D12 D13 D14 D15: library part 5975606507F, "LED BLUE 0805 SMD", Current - Test=5mA, Device Package="0805 (2012 Metric)", Lens Color=0.93mm, Manufacturer=Dialight, Millicandela Rating=36mcd, Supplier Device Package=0805, Supplier Part Number 1=350-4390-1-ND, Voltage - Forward (Vf) (Typ)=2.9V, Color=Blue, ComponentLink1Description=Datasheet, ComponentLink1URL=http:\\www.dialightsignalsandcomponents.com\Assets\Drawings\2D_Drawings_DrawingDetailedSpec\NewDrawings\18370A.pdf, ComponentLink2Description="DigiKey Link", ComponentLink2URL=https:\\www.digikey.com\en\products\detail\dialight\5975606507F\9385445, Configuration=Standard, Height (Max)=0.93mm, id=753, LastUpdated=2023-01-02T20:56:19, Lens Size="1.40mm x 1.24mm", Lens Style="Rectangle with Flat Top", Lifecycle Status=Active, Minimum Order=1, Mounting Type="Surface Mount", Package / Case="0805 (2012 Metric)", Packaging=TapeAndReel, Part Number=5975606507F, Part Status=Active, PartId=753, Price=0.14, Series=597, Size / Dimension="2.00mm L x 1.25mm W", Supplier 1=DigiKey, Wavelength - Dominant=470nm
J1: "USB Type-C Female Connector USB 3, Right Angle, 16P 3A 1 Ports", Manufacturer_Name=SHOUHAN, Manufacturer_Part_Number="TYPE-C 16P QTWT"
J2: "CONN HEADER VERT 2POS 2.54MM", Insulation Color=Natural, Manufacturer=Molex, Material Flammability Rating="UL94 V-0", Supplier Part Number 1=WM4111-ND, ComponentLink1Description=Datasheet, ComponentLink1URL=https:\\www.molex.com\pdm_docs\sd\022272021_sd.pdf, ComponentLink2Description="DigiKey Link", ComponentLink2URL=http:\\digikey.com\product-detail\en\molex\0022272021\WM4111-ND\1130577, Connector Type=Header, Contact Finish - Mating=Tin, Contact Finish - Post=Tin, Contact Finish Thickness - Mating="100.0µin (2.54µm)", Contact Length - Mating="0.295\" (7.49mm)", Contact Length - Post="0.140\" (3.56mm)", Contact Material=Brass, Contact Shape=Square, Contact Type="Male Pin", Fastening Type="Friction Lock", id=76, Insulation Height="0.461\" (11.70mm)", Insulation Material="Polyamide (PA), Nylon", LastUpdated=2020-01-12T23:51:43.453, Lifecycle Status=Active, Minimum Order=1, Mounting Type="Through Hole", Number Of Positions=2, Number Of Positions Loaded=All, Number Of Rows=1, Overall Contact Length="0.560\" (14.22mm)", Packaging=Bulk, Part Number=0022272021, Part Status=Active, PartId=76, Pitch - Mating="0.100\" (2.54mm)", Price=0.27, Series="KK 6410", Shrouding="Shrouded - 1 Wall", Style="Board to Cable\Wire", Supplier 1=DigiKey, Termination=Solder
J3 J4: "CONN HEADER VERT 4POS 2.54MM", Insulation Color=Natural, Manufacturer=Molex, Material Flammability Rating="UL94 V-0", Supplier Part Number 1=WM4113-ND, ComponentLink1Description=Datasheet, ComponentLink1URL=https:\\www.molex.com\pdm_docs\sd\022272041_sd.pdf, ComponentLink2Description="DigiKey Link", ComponentLink2URL=http:\\digikey.com\product-detail\en\molex\0022272041\WM4113-ND\1130579, Connector Type=Header, Contact Finish - Mating=Tin, Contact Finish - Post=Tin, Contact Finish Thickness - Mating="100.0µin (2.54µm)", Contact Length - Mating="0.295\" (7.49mm)", Contact Length - Post="0.140\" (3.56mm)", Contact Material=Brass, Contact Shape=Square, Contact Type="Male Pin", Fastening Type="Friction Lock", id=78, Insulation Height="0.461\" (11.70mm)", Insulation Material="Polyamide (PA), Nylon", LastUpdated=2020-01-12T23:52:05.287, Lifecycle Status=Active, Minimum Order=1, Mounting Type="Through Hole", Number Of Positions=4, Number Of Positions Loaded=All, Number Of Rows=1, Overall Contact Length="0.560\" (14.22mm)", Packaging=Bulk, Part Number=0022272041, Part Status=Active, PartId=78, Pitch - Mating="0.100\" (2.54mm)", Price=0.40, Series="KK 6410", Shrouding="Shrouded - 1 Wall", Style="Board to Cable\Wire", Supplier 1=DigiKey, Termination=Solder
L1: library part DFE252010P-R47M=P2, "FIXED IND 470NH 5A 35 MOHM SMD", Current Rating (Amps)=5A, DC Resistance (DCR)="35mOhm Max", Device Package="1008 (2520 Metric)", Inductance Frequency - Test=1MHz, Manufacturer="Murata Electronics", Operating Temperature="-40°C ~ 125°C", Part Number=DFE252012F-R47M=P2, Supplier Part Number 1=490-10641-1-ND, Tolerance=±20%, ComponentLink1Description=Datasheet, ComponentLink1URL=https:\\www.murata.com\~\media\webrenewal\products\inductor\chip\tokoproducts\wirewoundmetalalloychiptype\m_dfe252010p.ashx, ComponentLink2Description="DigiKey Link", ComponentLink2URL=http:\\digikey.com\product-detail\en\murata-electronics\DFE252010P-R47M=P2\490-10641-1-ND\5272069, Height - Seated (Max)="0.039\" (1.00mm)", id=3453, Inductance=470nH, LastUpdated=2022-03-24T14:40:41.850, Lifecycle Status=Active, Material - Core="Iron Powder", Minimum Order=1, Mounting Type="Surface Mount", Package / Case="1008 (2520 Metric)", Packaging=TapeAndReel, Part Status=Active, PartId=3481, Price=0.16, Series=DFE252010P, Shielding=Shielded, Size / Dimension="0.098\" L x 0.079\" W (2.50mm x 2.00mm)", Supplier 1=DigiKey, Supplier Device Package="1008 (2520 Metric)", Type=Wirewound
LED1: "ADDRESS LED RED/GRN/BLUE", Manufacturer_Name=Sparkfun, Manufacturer_Part_Number=COM-16347, Copyright="Copyright (C) 2026 Ultra Librarian. All rights reserved.", RefDes=RefDes, Type="LED Addressable"
R1: library part RMCF0805FT750K, "RES 750K OHM 1% 1\8W 0805", Device Package="0805 (2012 Metric)", Manufacturer="Stackpole Electronics Inc", Operating Temperature="-55°C ~ 155°C", Power (Watts)="0.125W, 1\8W", Ratings=AEC-Q200, Supplier Device Package=0805, Supplier Part Number 1=RMCF0805FT750KCT-ND, Temperature Coefficient=±100ppm\°C, Tolerance=±1%, ComponentLink1Description=Datasheet, ComponentLink1URL=https:\\www.seielect.com\catalog\sei-rmcf_rmcp.pdf, ComponentLink2Description="DigiKey Link", ComponentLink2URL=https:\\www.digikey.com\en\products\detail\stackpole-electronics-inc\RMCF0805FT750K\1760532, Composition="Thick Film", Features="Automotive AEC-Q200", Height - Seated (Max)="0.026\" (0.65mm)", id=88, LastUpdated=2023-01-02T20:44:51.690, Lifecycle Status=Active, Minimum Order=1, Number Of Terminations=2, Package / Case="0805 (2012 Metric)", Packaging=CutTape, Part Number=RMCF0805FT750K, Part Status=Active, PartId=27859, Price=0.01, Resistance="750 kOhms", Series=RMCF, Size / Dimension="0.079\" L x 0.049\" W (2.00mm x 1.25mm)", Supplier 1=DigiKey
R2 R9: library part CRGP0805F100K, "RES 100K OHM 1% 1\3W 0805", Device Package="0805 (2012 Metric)", Manufacturer="TE Connectivity Passive Product", Operating Temperature="-55°C ~ 155°C", Power (Watts)="0.333W, 1\3W", Supplier Device Package=0805, Supplier Part Number 1=A130501CT-ND, Temperature Coefficient=±100ppm\°C, Tolerance=±1%, ComponentLink1Description=Datasheet, ComponentLink1URL=https:\\www.te.com\commerce\DocumentDelivery\DDEController?Action=srchrtrv&DocNm=9-1773463-9&DocType=DS&DocLang=English, ComponentLink2Description="DigiKey Link", ComponentLink2URL=https:\\www.digikey.com\en\products\detail\te-connectivity-passive-product\CRGP0805F100K\8577103, Composition="Thick Film", Features="Pulse Withstanding", Height - Seated (Max)="0.026\" (0.65mm)", id=527, LastUpdated=2023-01-02T20:44:47.767, Lifecycle Status=Active, Minimum Order=1, Number Of Terminations=2, Package / Case="0805 (2012 Metric)", Packaging=TapeAndReel, Part Number=CRGP0805F100K, Part Status=Active, PartId=28747, Price=0.02, Resistance="100 kOhms", Series=CRGP, Size / Dimension="0.079\" L x 0.049\" W (2.00mm x 1.25mm)", Supplier 1=DigiKey
R3 R24 R25 R26 R27 R28 R29 R30 R31 R32 R33 R34 R35 R36 R37: library part RNCS0805BKE100R, "RES 100 OHM 0.1% 1\10W 0805", Device Package="0805 (2012 Metric)", Manufacturer="Stackpole Electronics Inc", Operating Temperature="-55°C ~ 155°C", Power (Watts)="0.1W, 1\10W", Ratings=AEC-Q200, Supplier Device Package=0805, Supplier Part Number 1=RNCS0805BKE100RCT-ND, Temperature Coefficient=±25ppm\°C, Tolerance=±0.1%, ComponentLink1Description=Datasheet, ComponentLink1URL=https:\\www.seielect.com\catalog\sei-rncs_rnch.pdf, ComponentLink2Description="DigiKey Link", ComponentLink2URL=https:\\www.digikey.com\en\products\detail\stackpole-electronics-inc\RNCS0805BKE100R\1800065, Composition="Thin Film", Features="Anti-Corrosive, Automotive AEC-Q200, Moisture Resistant", Height - Seated (Max)="0.026\" (0.65mm)", id=1341, LastUpdated=2023-01-02T20:44:41.260, Lifecycle Status=Active, Minimum Order=1, Number Of Terminations=2, Package / Case="0805 (2012 Metric)", Packaging=TapeAndReel, Part Number=RNCS0805BKE100R, Part Status=Active, PartId=30410, Price=0.09, Resistance="100 Ohms", Series=RNCS, Size / Dimension="0.079\" L x 0.049\" W (2.00mm x 1.25mm)", Supplier 1=DigiKey
R4: library part RMCF0805FT3K60, "RES 3.6K OHM 1% 1\8W 0805", Device Package="0805 (2012 Metric)", Manufacturer="Stackpole Electronics Inc", Operating Temperature="-55°C ~ 155°C", Power (Watts)="0.125W, 1\8W", Ratings=AEC-Q200, Supplier Device Package=0805, Supplier Part Number 1=RMCF0805FT3K60CT-ND, Temperature Coefficient=±100ppm\°C, Tolerance=±1%, ComponentLink1Description=Datasheet, ComponentLink1URL=https:\\www.seielect.com\catalog\sei-rmcf_rmcp.pdf, ComponentLink2Description="DigiKey Link", ComponentLink2URL=https:\\www.digikey.com\en\products\detail\stackpole-electronics-inc\RMCF0805FT3K60\1712987, Composition="Thick Film", Features="Automotive AEC-Q200", Height - Seated (Max)="0.026\" (0.65mm)", id=2405, LastUpdated=2023-01-02T20:44:32.503, Lifecycle Status=Active, Minimum Order=1, Number Of Terminations=2, Package / Case="0805 (2012 Metric)", Packaging=CutTape, Part Number=RMCF0805FT3K60, Part Status=Active, PartId=32503, Price=0.01, Resistance="3.6 kOhms", Series=RMCF, Size / Dimension="0.079\" L x 0.049\" W (2.00mm x 1.25mm)", Supplier 1=DigiKey
R5: library part RMCF0805FG1K10, "RES 1.1K OHM 1% 1\8W 0805", Device Package="0805 (2012 Metric)", Manufacturer="Stackpole Electronics Inc", Operating Temperature="-55°C ~ 155°C", Power (Watts)="0.125W, 1\8W", Ratings=AEC-Q200, Supplier Device Package=0805, Supplier Part Number 1=RMCF0805FG1K10CT-ND, Temperature Coefficient=±100ppm\°C, Tolerance=±1%, ComponentLink1Description=Datasheet, ComponentLink1URL=https:\\www.seielect.com\catalog\sei-rmcf_rmcp.pdf, ComponentLink2Description="DigiKey Link", ComponentLink2URL=https:\\www.digikey.com\en\products\detail\stackpole-electronics-inc\RMCF0805FG1K10\1760461, Composition="Thick Film", Features="Automotive AEC-Q200", Height - Seated (Max)="0.026\" (0.65mm)", id=606, LastUpdated=2023-01-02T20:44:47.117, Lifecycle Status=Active, Minimum Order=1, Number Of Terminations=2, Package / Case="0805 (2012 Metric)", Packaging=CutTape, Part Number=RMCF0805FG1K10, Part Status=Active, PartId=28907, Price=0.01, Resistance="1.1 kOhms", Series=RMCF, Size / Dimension="0.079\" L x 0.049\" W (2.00mm x 1.25mm)", Supplier 1=DigiKey
R6: library part RMCF0805FT22K0, "RES 22K OHM 1% 1\8W 0805", Device Package="0805 (2012 Metric)", Manufacturer="Stackpole Electronics Inc", Operating Temperature="-55°C ~ 155°C", Power (Watts)="0.125W, 1\8W", Ratings=AEC-Q200, Supplier Device Package=0805, Supplier Part Number 1=RMCF0805FT22K0CT-ND, Temperature Coefficient=±100ppm\°C, Tolerance=±1%, ComponentLink1Description=Datasheet, ComponentLink1URL=https:\\www.seielect.com\catalog\sei-rmcf_rmcp.pdf, ComponentLink2Description="DigiKey Link", ComponentLink2URL=https:\\www.digikey.com\en\products\detail\stackpole-electronics-inc\RMCF0805FT22K0\1760246, Composition="Thick Film", Features="Automotive AEC-Q200", Height - Seated (Max)="0.026\" (0.65mm)", id=2357, LastUpdated=2023-01-02T20:44:32.837, Lifecycle Status=Active, Minimum Order=1, Number Of Terminations=2, Package / Case="0805 (2012 Metric)", Packaging=CutTape, Part Number=RMCF0805FT22K0, Part Status=Active, PartId=32406, Price=0.01, Resistance="22 kOhms", Series=RMCF, Size / Dimension="0.079\" L x 0.049\" W (2.00mm x 1.25mm)", Supplier 1=DigiKey
R7: library part RMCF0805FT3K30, "RES 3.3K OHM 1% 1\8W 0805", Device Package="0805 (2012 Metric)", Manufacturer="Stackpole Electronics Inc", Operating Temperature="-55°C ~ 155°C", Power (Watts)="0.125W, 1\8W", Ratings=AEC-Q200, Supplier Device Package=0805, Supplier Part Number 1=RMCF0805FT3K30CT-ND, Temperature Coefficient=±100ppm\°C, Tolerance=±1%, ComponentLink1Description=Datasheet, ComponentLink1URL=https:\\www.seielect.com\catalog\sei-rmcf_rmcp.pdf, ComponentLink2Description="DigiKey Link", ComponentLink2URL=https:\\www.digikey.com\en\products\detail\stackpole-electronics-inc\RMCF0805FT3K30\1760325, Composition="Thick Film", Features="Automotive AEC-Q200", Height - Seated (Max)="0.026\" (0.65mm)", id=2398, LastUpdated=2023-01-02T20:44:32.553, Lifecycle Status=Active, Minimum Order=1, Number Of Terminations=2, Package / Case="0805 (2012 Metric)", Packaging=CutTape, Part Number=RMCF0805FT3K30, Part Status=Active, PartId=32489, Price=0.01, Resistance="3.3 kOhms", Series=RMCF, Size / Dimension="0.079\" L x 0.049\" W (2.00mm x 1.25mm)", Supplier 1=DigiKey
R8: library part RMCF0805FT510K, "RES 510K OHM 1% 1\8W 0805", Device Package="0805 (2012 Metric)", Manufacturer="Stackpole Electronics Inc", Operating Temperature="-55°C ~ 155°C", Power (Watts)="0.125W, 1\8W", Ratings=AEC-Q200, Supplier Device Package=0805, Supplier Part Number 1=RMCF0805FT510KCT-ND, Temperature Coefficient=±100ppm\°C, Tolerance=±1%, ComponentLink1Description=Datasheet, ComponentLink1URL=https:\\www.seielect.com\catalog\sei-rmcf_rmcp.pdf, ComponentLink2Description="DigiKey Link", ComponentLink2URL=https:\\www.digikey.com\en\products\detail\stackpole-electronics-inc\RMCF0805FT510K\1713215, Composition="Thick Film", Features="Automotive AEC-Q200", Height - Seated (Max)="0.026\" (0.65mm)", id=909, LastUpdated=2023-01-02T20:44:44.913, Lifecycle Status=Active, Minimum Order=1, Number Of Terminations=2, Package / Case="0805 (2012 Metric)", Packaging=CutTape, Part Number=RMCF0805FT510K, Part Status=Active, PartId=29516, Price=0.01, Resistance="510 kOhms", Series=RMCF, Size / Dimension="0.079\" L x 0.049\" W (2.00mm x 1.25mm)", Supplier 1=DigiKey
R10 R11 R12 R13 R16 R17 R19 R38: library part RNCP0805FTD10K0, "RES 10K OHM 1% 1\4W 0805", Device Package="0805 (2012 Metric)", Manufacturer="Stackpole Electronics Inc", Operating Temperature="-55°C ~ 155°C", Power (Watts)="0.25W, 1\4W", Supplier Device Package=0805, Supplier Part Number 1=RNCP0805FTD10K0CT-ND, Temperature Coefficient=±100ppm\°C, Tolerance=±1%, ComponentLink1Description=Datasheet, ComponentLink1URL=https:\\www.seielect.com\catalog\sei-rncp.pdf, ComponentLink2Description="DigiKey Link", ComponentLink2URL=https:\\www.digikey.com\en\products\detail\stackpole-electronics-inc\RNCP0805FTD10K0\2240262, Composition="Thin Film", Features=Anti-Sulfur, Height - Seated (Max)="0.025\" (0.65mm)", id=164, LastUpdated=2023-01-02T20:44:50.960, Lifecycle Status=Active, Minimum Order=1, Number Of Terminations=2, Package / Case="0805 (2012 Metric)", Packaging=TapeAndReel, Part Number=RNCP0805FTD10K0, Part Status=Active, PartId=28021, Price=0.01, Resistance="10 kOhms", Series=RNCP, Size / Dimension="0.079\" L x 0.049\" W (2.00mm x 1.25mm)", Supplier 1=DigiKey
R14 R15 R20 R21: library part RMCF0805FT4K70, "RES 4.7K OHM 1% 1\8W 0805", Device Package="0805 (2012 Metric)", Manufacturer="Stackpole Electronics Inc", Operating Temperature="-55°C ~ 155°C", Power (Watts)="0.125W, 1\8W", Ratings=AEC-Q200, Supplier Device Package=0805, Supplier Part Number 1=RMCF0805FT4K70CT-ND, Temperature Coefficient=±100ppm\°C, Tolerance=±1%, ComponentLink1Description=Datasheet, ComponentLink1URL=https:\\www.seielect.com\catalog\sei-rmcf_rmcp.pdf, ComponentLink2Description="DigiKey Link", ComponentLink2URL=https:\\www.digikey.com\en\products\detail\stackpole-electronics-inc\RMCF0805FT4K70\1760659, Composition="Thick Film", Features="Automotive AEC-Q200", Height - Seated (Max)="0.026\" (0.65mm)", id=2365, LastUpdated=2023-01-02T20:44:32.783, Lifecycle Status=Active, Minimum Order=1, Number Of Terminations=2, Package / Case="0805 (2012 Metric)", Packaging=CutTape, Part Number=RMCF0805FT4K70, Part Status=Active, PartId=32422, Price=0.01, Resistance="4.7 kOhms", Series=RMCF, Size / Dimension="0.079\" L x 0.049\" W (2.00mm x 1.25mm)", Supplier 1=DigiKey
R18: library part RMCF0603FT220R, "RES 220 OHM 1% 1\10W 0603", Device Package="0603 (1608 Metric)", Manufacturer="Stackpole Electronics Inc", Operating Temperature="-55°C ~ 155°C", Power (Watts)="0.1W, 1\10W", Ratings=AEC-Q200, Supplier Device Package=0603, Supplier Part Number 1=RMCF0603FT220RCT-ND, Temperature Coefficient=±100ppm\°C, Tolerance=±1%, ComponentLink1Description=Datasheet, ComponentLink1URL=https:\\www.seielect.com\catalog\sei-rmcf_rmcp.pdf, ComponentLink2Description="DigiKey Link", ComponentLink2URL=https:\\www.digikey.com\en\products\detail\stackpole-electronics-inc\RMCF0603FT220R\1760809, Composition="Thick Film", Features="Automotive AEC-Q200", Height - Seated (Max)="0.022\" (0.55mm)", id=593, LastUpdated=2023-01-02T20:30:22.033, Lifecycle Status=Active, Minimum Order=1, Number Of Terminations=2, Package / Case="0603 (1608 Metric)", Packaging=CutTape, Part Number=RMCF0603FT220R, Part Status=Active, PartId=6086, Price=0.01, Resistance="220 Ohms", Series=RMCF, Size / Dimension="0.061\" L x 0.031\" W (1.55mm x 0.80mm)", Supplier 1=DigiKey
R22: "CDS PHOTORESISTOR"
R23: library part CRGP0805F470K, "RES 470K OHM 1% 1\3W 0805", Device Package="0805 (2012 Metric)", Manufacturer="TE Connectivity Passive Product", Operating Temperature="-55°C ~ 155°C", Power (Watts)="0.333W, 1\3W", Supplier Device Package=0805, Supplier Part Number 1=A130509CT-ND, Temperature Coefficient=±100ppm\°C, Tolerance=±1%, ComponentLink1Description=Datasheet, ComponentLink1URL=https:\\www.te.com\commerce\DocumentDelivery\DDEController?Action=srchrtrv&DocNm=9-1773463-9&DocType=DS&DocLang=English, ComponentLink2Description="DigiKey Link", ComponentLink2URL=https:\\www.digikey.com\en\products\detail\te-connectivity-passive-product\CRGP0805F470K\8577111, Composition="Thick Film", Features="Pulse Withstanding", Height - Seated (Max)="0.026\" (0.65mm)", id=531, LastUpdated=2023-01-02T20:44:47.733, Lifecycle Status=Active, Minimum Order=1, Number Of Terminations=2, Package / Case="0805 (2012 Metric)", Packaging=TapeAndReel, Part Number=CRGP0805F470K, Part Status=Active, PartId=28755, Price=0.02, Resistance="470 kOhms", Series=CRGP, Size / Dimension="0.079\" L x 0.049\" W (2.00mm x 1.25mm)", Supplier 1=DigiKey
SW1: "Rocker Switch SPST", Manufacturer Name=Non-Brand, Manufacturer Part Number="KCD1-2-(3A 250V AC)"
U1: "Boost Switching Regulator IC Positive Adjustable 2.2V 1 Output 3A SOT-563, SOT-666", Manufacturer Name="Texas Instruments", Manufacturer Part Number=TPS61023DRLR
U2: "Linear Voltage Regulator IC Positive Adjustable 1 Output 1.5A 10-VSON (3x3)", Manufacturer="Texas Instruments", CompType=IC, Manufacturer Name="Texas Instruments", Manufacturer Part Number=TPS74801DRCR, MountType=SMT, PackageReference=DRC0010A, RoHS=Y
U3: "1A Linear Li-Ion Battery Charger with Trickle Charge", Manufacturer Name="Monolithic Power Systems", Manufacturer Part Number=MP26028EQ-LF-Z
U4: "Mainstream Performance line, Arm Cortex-M3 MCU with 512 Kbytes of Flash memory, 72 MHz CPU, motor control, USB and CAN", Manufacturer Name=STMicroelectronics, Manufacturer Part Number=STM32F103VET6
U5 U6 U7 U8 U9: "Description", Manufacturer_Name="C&K Components", Copyright="Copyright (C) 2026 Ultra Librarian. All rights reserved.", Manufacturer_Part_Number=PTS645SM43SMTR92LFS, RefDes=RefDes, Type=Type
U10 U13 U14 U15 U16 U17 U18 U19 U20 U21 U22 U23 U24 U25 U26: "MOSFET N-CH 60V 180MA SOT23", Current - Continuous Drain (Id) @ 25°C="180mA (Ta)", Drain To Source Voltage (Vdss)="60 V", Drive Voltage (Max Rds On,  Min Rds On)="5V, 10V", Input Capacitance (Ciss) (Max) @ Vds="23 pF @ 25 V", Manufacturer="Diodes Incorporated", Operating Temperature="-55°C ~ 150°C (TJ)", Package / Case="TO-236-3, SC-59, SOT-23-3", Power Dissipation (Max)="370mW (Ta)", Supplier Device Package=SOT-23-3, Supplier Part Number 1=2N7002A-7DICT-ND, ComponentLink1Description=Datasheet, ComponentLink1URL=https:\\www.diodes.com\assets\Datasheets\ds31360.pdf, ComponentLink2Description="DigiKey Link", ComponentLink2URL=https:\\www.digikey.com\en\products\detail\diodes-incorporated\2N7002A-7\3451498, FET Type=N-Channel, id=68, LastUpdated=2023-01-02T21:04:51.983, Lifecycle Status=Active, Minimum Order=1, Mounting Type="Surface Mount", Packaging=TapeAndReel, Part Number=2N7002A-7, Part Status=Active, Price=0.05, Rds On (Max) @ Id, Vgs="6Ohm @ 115mA, 5V", Series=-, Supplier 1=DigiKey, Technology="MOSFET (Metal Oxide)", Vgs (Max)=±20V, Vgs(Th) (Max) @ Id="2V @ 250µA"
U11: "Digital Switch Unipolar Switch Current Source Hall Effect 3-SIP", Manufacturer Name="Allegro Microsystems", Manufacturer Part Number=A3144EUA
U12: "Description", Manufacturer_Name=TDK, Copyright="Copyright (C) 2025 Ultra Librarian. All rights reserved.", Manufacturer_Part_Number=MPU-6050, RefDes=RefDes, Type="Motion Sensors"

## Via types
v1: diameter 0.762, hole 0.381, Top Layer to Bottom Layer, tented both sides, 222 vias
v2: diameter 1.524, hole 0.762, Top Layer to Bottom Layer, tented both sides, 17 vias
v3: diameter 0.508, hole 0.254, Top Layer to Bottom Layer, tented both sides, 14 vias
v4: diameter 1.016, hole 0.508, Top Layer to Bottom Layer, tented both sides, 8 vias